# Altium PCB 24V-70A-Power-Board-v2.0.PcbDoc (part 3 of 9)
Units mm, origin at the board's own origin, x right, y up, seen from the top; angles counter-clockwise.
Board outline 350 x 215 mm, 2 copper layers (Top Layer, Bottom Layer), stack 1.64 mm thick; 337 components, 182 nets, 856 pads, 561 vias.
Unrouted connection lines stored in the file: 58.
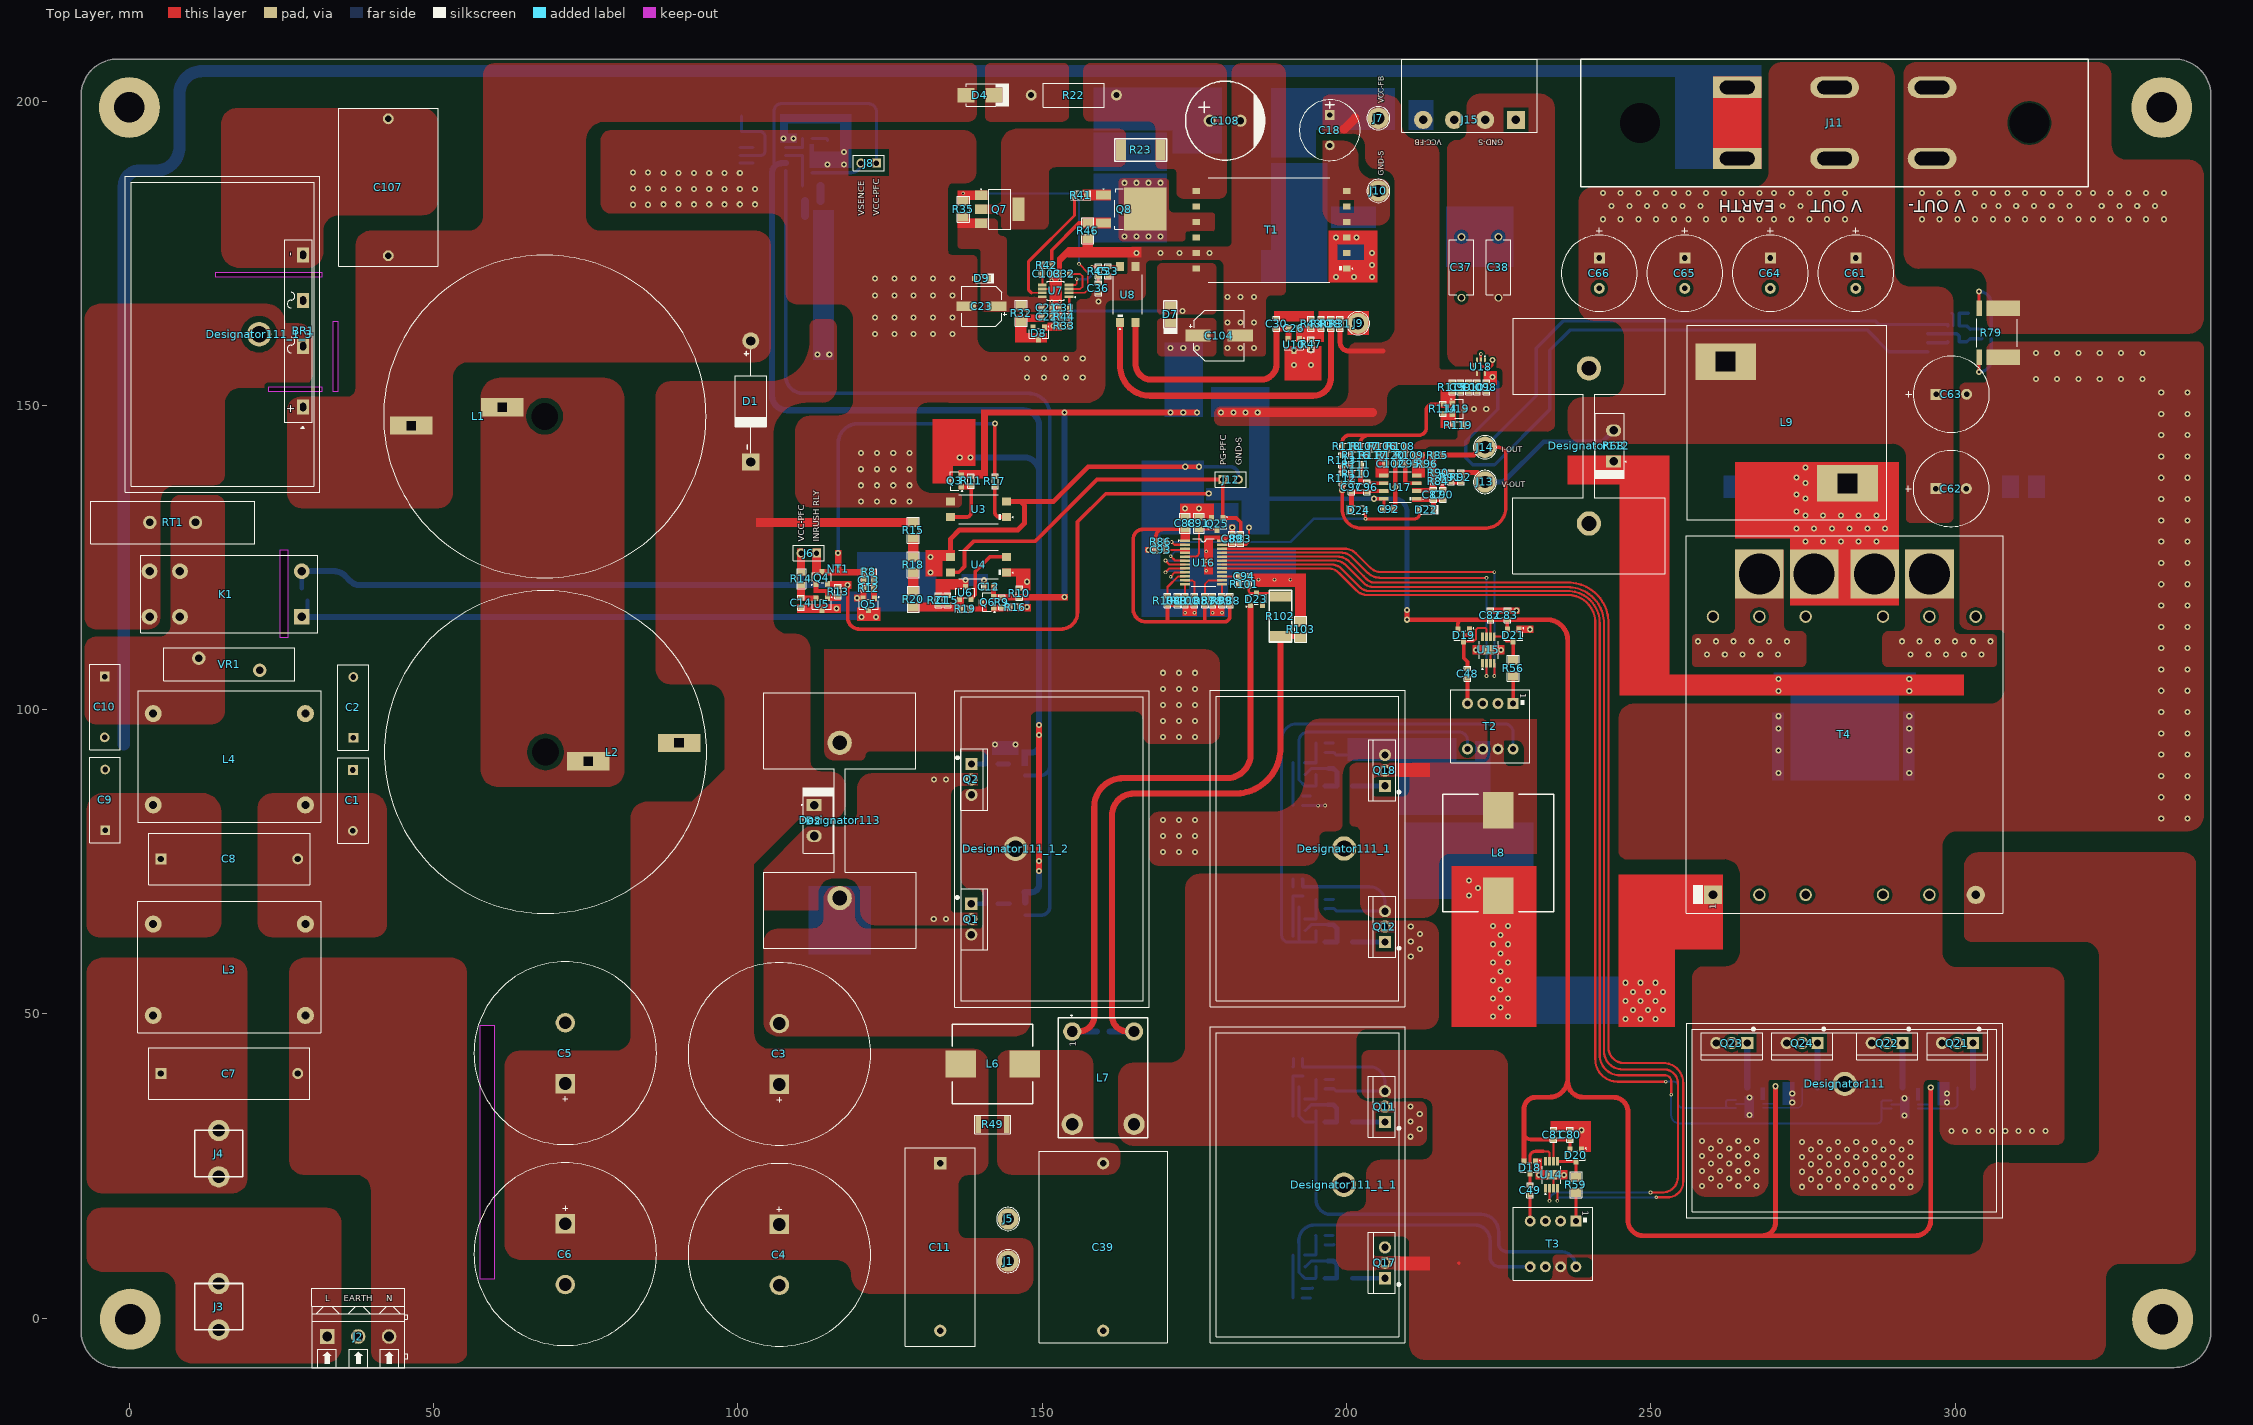
[diagram p0: Top Layer view]

## Part data (continued)
J1 J7 J13 J14: "PC TEST POINT MULTIPURPOSE RED", LCSC Part Number=C2906765, Manufacturer="Keystone Electronics", ComponentLink1Description=https://datasheet.ciiva.com/11744/0900766b8009b7c7-11744920.pdf?src-supplier=Rs, ComponentLink1URL=https://datasheet.ciiva.com/11744/0900766b8009b7c7-11744920.pdf?src-supplier=Rs, ComponentLink2Description=https://datasheet.ciiva.com/16506/m60-2p60-16506972.pdf?src-supplier=Future+Electronics, ComponentLink2URL=https://datasheet.ciiva.com/16506/m60-2p60-16506972.pdf?src-supplier=Future+Electronics, ComponentLink3Description=https://datasheet.ciiva.com/22631/1703983-22631113.pdf?src-supplier=Element14, ComponentLink3URL=https://datasheet.ciiva.com/22631/1703983-22631113.pdf?src-supplier=Element14, ComponentLink4Description=https://datasheet.ciiva.com/16883/70182825-16883886.pdf?src-supplier=Allied+Electronics, ComponentLink4URL=https://datasheet.ciiva.com/16883/70182825-16883886.pdf?src-supplier=Allied+Electronics, ComponentLink5Description=https://datasheet.ciiva.com/2917/5010-2917626.pdf?src-supplier=Digikey, ComponentLink5URL=https://datasheet.ciiva.com/2917/5010-2917626.pdf?src-supplier=Digikey, ComponentLink6Description=https://datasheet.ciiva.com/1454/1703983-1454833.pdf?src-supplier=Element14, ComponentLink6URL=https://datasheet.ciiva.com/1454/1703983-1454833.pdf?src-supplier=Element14, Item Type=Connectors, Manufacturer Part Number=5010, Pricing="1=0.38, 25=0.308, 100=0.3015, 250=0.28304, 500=0.2523, 1000=0.17746, 2500=0.16225, 5000=0.15211 (USD)", RoHS=Yes, Stock=128327, Supplier=Digikey
J2: "1x3P 18A -40℃~+105℃ 250V Orange 12~30 Direct Insert 5.08mm 2.5 1 3 Plugin,P=5.08mm Screw Terminal Blocks ROHS", LCSC Part Number=C430604, Manufacturer=DORABO, Package=Plugin,P=5.08mm, ComponentLink1Description=LCSC, ComponentLink1URL=https://www.lcsc.com/product-detail/Screw-Terminal-Blocks_DORABO-DB128L-5-08-3P-OG-S_C430604.html, Item Type="Terminal Block", Manufacturer Part Number=DB128L-5.08-3P-OG-S
J3 J4: "FUSE CLIP CARTRIDGE 250V 15A PCB", LCSC Part Number=C142745, Manufacturer=Littelfuse, ComponentLink1Description=https://datasheet.ciiva.com/30471/0900766b8128f6e8-30471828.pdf?src-supplier=Rs, ComponentLink1URL=https://datasheet.ciiva.com/30471/0900766b8128f6e8-30471828.pdf?src-supplier=Rs, ComponentLink2Description=https://datasheet.ciiva.com/14119/102-series-eng-tds-14119839.pdf?src-supplier=Distrelec, ComponentLink2URL=https://datasheet.ciiva.com/14119/102-series-eng-tds-14119839.pdf?src-supplier=Distrelec, ComponentLink3Description=https://datasheet.ciiva.com/1269/1480080-1269262.pdf?src-supplier=Element14, ComponentLink3URL=https://datasheet.ciiva.com/1269/1480080-1269262.pdf?src-supplier=Element14, ComponentLink4Description=https://datasheet.ciiva.com/1270/littelfuse-fuse-clips-1270929.pdf?src-supplier=Element14, ComponentLink4URL=https://datasheet.ciiva.com/1270/littelfuse-fuse-clips-1270929.pdf?src-supplier=Element14, ComponentLink5Description=https://datasheet.ciiva.com/295/littelfuse-fuse-clips-295516.pdf?src-supplier=Digikey, ComponentLink5URL=https://datasheet.ciiva.com/295/littelfuse-fuse-clips-295516.pdf?src-supplier=Digikey, ComponentLink6Description=https://datasheet.ciiva.com/15201/getdatasheetpartid-336939-15201068.pdf?src-supplier=Verical, ComponentLink6URL=https://datasheet.ciiva.com/15201/getdatasheetpartid-336939-15201068.pdf?src-supplier=Verical, Item Type="Fuse Holder", Lead Free=5697LeadFree, Manufacturer Part Number=01020071Z, Pricing="1=0.27, 5=0.228, 10=0.21, 50=0.1754, 100=0.1622, 250=0.14612, 500=0.13502, 1000=0.12473, 5000=0.1036 (USD)", RoHS=Yes, Stock=48674, Supplier=Digikey
J5 J10: "PC TEST POINT MULTIPURPOSE BLACK", LCSC Part Number=C238127, Manufacturer="Keystone Electronics", ComponentLink1Description=https://datasheet.ciiva.com/11744/0900766b8009b7c7-11744935.pdf?src-supplier=Rs, ComponentLink1URL=https://datasheet.ciiva.com/11744/0900766b8009b7c7-11744935.pdf?src-supplier=Rs, ComponentLink2Description=https://datasheet.ciiva.com/1454/1718230-1454834.pdf?src-supplier=Element14, ComponentLink2URL=https://datasheet.ciiva.com/1454/1718230-1454834.pdf?src-supplier=Element14, ComponentLink3Description=https://datasheet.ciiva.com/46412/1703983-46412138.pdf?src-supplier=Element14, ComponentLink3URL=https://datasheet.ciiva.com/46412/1703983-46412138.pdf?src-supplier=Element14, ComponentLink4Description=https://datasheet.ciiva.com/16351/m60-2p60-16351093.pdf?src-supplier=Future+Electronics, ComponentLink4URL=https://datasheet.ciiva.com/16351/m60-2p60-16351093.pdf?src-supplier=Future+Electronics, ComponentLink5Description=https://datasheet.ciiva.com/2917/5011-2917635.pdf?src-supplier=Digikey, ComponentLink5URL=https://datasheet.ciiva.com/2917/5011-2917635.pdf?src-supplier=Digikey, Gender=30Gender, Inside Diameter=1.78mm, Item Type=Connectors, Lead Free=5697LeadFree, Length=11.3mm, Manufacturer Part Number=5011, Pricing="1=0.38, 25=0.308, 100=0.3015, 250=0.28304, 500=0.2523, 1000=0.17746, 2500=0.16225, 5000=0.15211 (USD)", RoHS=Yes, Stock=243196, Supplier=Digikey
J6 J8 J12: "Gold 250V 3A Straight Square Pins 2.5mm 2P 260℃ 6mm -40℃~+105℃ 3mm 2.54mm Plugin Black Brass 1x2P Plugin,P=2.54mm Pin Headers ROHS", LCSC Part Number=C706874, Manufacturer=XKB, Package=Plugin,P=2.54mm, ComponentLink1Description=LCSC, ComponentLink1URL=https://www.lcsc.com/product-detail/Pin-Headers_XKB-Connectivity-X6511WV-02H-C60D30_C706874.html, Item Type="Male Header", Manufacturer Part Number=X6511WV-02H-C60D30
J9: "PC TEST POINT MULTIPURPOSE WHITE", LCSC Part Number=C2906766, Manufacturer="Keystone Electronics", ComponentLink1Description=https://datasheet.ciiva.com/27052/1582065-27052612.pdf?src-supplier=Jameco, ComponentLink1URL=https://datasheet.ciiva.com/27052/1582065-27052612.pdf?src-supplier=Jameco, ComponentLink2Description=https://datasheet.ciiva.com/16200/m60-2p60-16200039.pdf?src-supplier=Future+Electronics, ComponentLink2URL=https://datasheet.ciiva.com/16200/m60-2p60-16200039.pdf?src-supplier=Future+Electronics, ComponentLink3Description=https://datasheet.ciiva.com/22631/1703983-22631115.pdf?src-supplier=Element14, ComponentLink3URL=https://datasheet.ciiva.com/22631/1703983-22631115.pdf?src-supplier=Element14, ComponentLink4Description=https://datasheet.ciiva.com/16884/70182825-16884150.pdf?src-supplier=Allied+Electronics, ComponentLink4URL=https://datasheet.ciiva.com/16884/70182825-16884150.pdf?src-supplier=Allied+Electronics, ComponentLink5Description=https://datasheet.ciiva.com/2917/5012-2917634.pdf?src-supplier=Digikey, ComponentLink5URL=https://datasheet.ciiva.com/2917/5012-2917634.pdf?src-supplier=Digikey, ComponentLink6Description=https://datasheet.ciiva.com/1454/1703983-1454835.pdf?src-supplier=Element14, ComponentLink6URL=https://datasheet.ciiva.com/1454/1703983-1454835.pdf?src-supplier=Element14, Item Type=Connectors, Manufacturer Part Number=5012, Pricing="1=0.38, 25=0.308, 100=0.3015, 250=0.28304, 500=0.2523, 1000=0.17746, 2500=0.16225, 5000=0.15211 (USD)", RoHS=Yes, Stock=102631, Supplier=Digikey
J11: "1x3P With Cover Plate 3 1 16mm -40℃~+105℃ 76A 1kV Black 6~14 Straight Needle 16 Plugin,P=16mm Barrier Terminal Blocks ROHS", LCSC Part Number=C707770, Manufacturer="Cixi Kefa Elec", Package=Plugin,P=16mm, ComponentLink1Description=LCSC, ComponentLink1URL=https://www.lcsc.com/product-detail/Barrier-Terminal-Blocks_Cixi-Kefa-Elec-KF88SM-16-0-3P_C707770.html, Item Type="Terminal Block", Manufacturer Part Number=KF88SM-16.0-3P
J15: "TERM BLOCK HDR 4POS 90DEG 5.08MM", Housing Color=49Colour, LCSC Part Number=C90076, Manufacturer="Phoenix Contact", Max Operating Temperature=70°C, Voltage Rating (DC)=250V, ComponentLink1Description=https://datasheet.ciiva.com/15197/getdatasheetpartid-176352-15197330.pdf?src-supplier=Verical, ComponentLink1URL=https://datasheet.ciiva.com/15197/getdatasheetpartid-176352-15197330.pdf?src-supplier=Verical, ComponentLink2Description=https://datasheet.ciiva.com/795/1757268-795434.pdf?src-supplier=Digikey, ComponentLink2URL=https://datasheet.ciiva.com/795/1757268-795434.pdf?src-supplier=Digikey, ComponentLink3Description=https://datasheet.ciiva.com/7630/1697153-7630841.pdf?src-supplier=Element14, ComponentLink3URL=https://datasheet.ciiva.com/7630/1697153-7630841.pdf?src-supplier=Element14, ComponentLink4Description=https://datasheet.ciiva.com/16096/1757268-16096406.pdf?src-supplier=Onlinecomponents.com, ComponentLink4URL=https://datasheet.ciiva.com/16096/1757268-16096406.pdf?src-supplier=Onlinecomponents.com, ComponentLink5Description=https://datasheet.ciiva.com/29210/569323-da-01-en-grundgehaeuse-1757268-250-st-29210575.pdf?src-supplier=Conrad, ComponentLink5URL=https://datasheet.ciiva.com/29210/569323-da-01-en-grundgehaeuse-1757268-250-st-29210575.pdf?src-supplier=Conrad, ComponentLink6Description=https://datasheet.ciiva.com/16703/70054631-16703596.pdf?src-supplier=Allied+Electronics, ComponentLink6URL=https://datasheet.ciiva.com/16703/70054631-16703596.pdf?src-supplier=Allied+Electronics, Gender=29Gender, Item Type="Terminal Blocks", Lead Free=5697LeadFree, Manufacturer Part Number=1757268, Pricing="1=1.49, 10=1.003, 25=0.9588 (USD)", RoHS=Yes, Stock=18354, Supplier=Digikey
K1: "RELAY GEN PURPOSE SPST 16A 12V", LCSC Part Number=C6120224, Manufacturer=Panasonic, ComponentLink1Description=https://datasheet.ciiva.com/24416/mech-eng-lz-24416941.pdf?src-supplier=Onlinecomponents.com, ComponentLink1URL=https://datasheet.ciiva.com/24416/mech-eng-lz-24416941.pdf?src-supplier=Onlinecomponents.com, Item Type="Power Relays", Manufacturer Part Number=ALZ51B12W, Pricing="1=3.35, 10=2.79, 50=2.65, 100=2.4, 1000=1.72, 10000=1.72 (USD)", RoHS=Yes, Stock=24, Supplier=Mouser
L1 L2: library part 760801401, "FIXED IND 118UH 13.9A 0.022OHM", Manufacturer="Wurth Electronics", Supplier Part Number=732-760801401-ND, Item Type=Inductors, Manufacturer Part Number=760801401, Pricing="1=18.9, 5=17.01, 10=15.12, 20=14.175, 100=13.2301 (USD)", RoHS=No, Stock=36, Supplier=Digikey
L3 L4: "CMC 1MH 12A 2LN TH", Manufacturer="Wurth Electronics", Supplier Part Number=732-1454-ND, ComponentLink1Description=https://datasheet.ciiva.com/6216/7448251201-6216302.pdf?src-supplier=Digikey, ComponentLink1URL=https://datasheet.ciiva.com/6216/7448251201-6216302.pdf?src-supplier=Digikey, ComponentLink2Description=https://datasheet.ciiva.com/4952/7448251201-46375-4952324.pdf?src-supplier=Mouser, ComponentLink2URL=https://datasheet.ciiva.com/4952/7448251201-46375-4952324.pdf?src-supplier=Mouser, ComponentLink3Description=https://datasheet.ciiva.com/11796/0900766b804acf5b-11796661.pdf?src-supplier=Rs, ComponentLink3URL=https://datasheet.ciiva.com/11796/0900766b804acf5b-11796661.pdf?src-supplier=Rs, ComponentLink4Description=https://datasheet.ciiva.com/7754/1736539-7754744.pdf?src-supplier=Element14, ComponentLink4URL=https://datasheet.ciiva.com/7754/1736539-7754744.pdf?src-supplier=Element14, ComponentLink5Description=https://datasheet.ciiva.com/7211/70416-7211268.pdf?src-supplier=Newark, ComponentLink5URL=https://datasheet.ciiva.com/7211/70416-7211268.pdf?src-supplier=Newark, ComponentLink6Description=https://datasheet.ciiva.com/14124/ue7448251201-de-14124967.pdf?src-supplier=Distrelec, ComponentLink6URL=https://datasheet.ciiva.com/14124/ue7448251201-de-14124967.pdf?src-supplier=Distrelec, Item Type=Inductors, Manufacturer Part Number=7448251201, Pricing="1=6.33, 10=6.23, 50=4.94, 175=4.73006, 350=4.6368 (USD)", RoHS=Yes, Stock=1202, Supplier=Digikey
L5: library part 7447745022, "FIXED IND 2.2UH 3.6A 36 MOHM SMD", Manufacturer="Wurth Electronics", ComponentLink1Description=https://datasheet.ciiva.com/4954/7447745022-70534-4954819.pdf?src-supplier=Mouser, ComponentLink1URL=https://datasheet.ciiva.com/4954/7447745022-70534-4954819.pdf?src-supplier=Mouser, ComponentLink2Description=https://datasheet.ciiva.com/30489/0900766b811bf6b7-30489497.pdf?src-supplier=Rs, ComponentLink2URL=https://datasheet.ciiva.com/30489/0900766b811bf6b7-30489497.pdf?src-supplier=Rs, ComponentLink3Description=https://datasheet.ciiva.com/7892/1736408-7892891.pdf?src-supplier=Element14, ComponentLink3URL=https://datasheet.ciiva.com/7892/1736408-7892891.pdf?src-supplier=Element14, ComponentLink4Description=https://datasheet.ciiva.com/6700/7447745022-6700388.pdf?src-supplier=Digikey, ComponentLink4URL=https://datasheet.ciiva.com/6700/7447745022-6700388.pdf?src-supplier=Digikey, ComponentLink5Description=https://datasheet.ciiva.com/6700/7447745022-6700390.pdf?src-supplier=Digikey, ComponentLink5URL=https://datasheet.ciiva.com/6700/7447745022-6700390.pdf?src-supplier=Digikey, Item Type=Inductors, Manufacturer Part Number=7447745022, Pricing="1=1.87, 10=1.791, 50=1.612, 100=1.492, 500=1.433, 1000=1.313 (USD)", RoHS=Yes, Stock=1399, Supplier=Digikey
L6: "FIXED IND 2.3UH 17.5A 3.7MOHM SM", Manufacturer="Wurth Electronics", Supplier Part Number=732-7443550230CT-ND, ComponentLink1Description=https://datasheet.ciiva.com/4954/7443550230-82185-4954542.pdf?src-supplier=Mouser, ComponentLink1URL=https://datasheet.ciiva.com/4954/7443550230-82185-4954542.pdf?src-supplier=Mouser, ComponentLink2Description=https://datasheet.ciiva.com/11801/0900766b80f886e1-11801808.pdf?src-supplier=Rs, ComponentLink2URL=https://datasheet.ciiva.com/11801/0900766b80f886e1-11801808.pdf?src-supplier=Rs, ComponentLink3Description=https://datasheet.ciiva.com/7765/1735881-7765096.pdf?src-supplier=Element14, ComponentLink3URL=https://datasheet.ciiva.com/7765/1735881-7765096.pdf?src-supplier=Element14, ComponentLink4Description=https://datasheet.ciiva.com/6705/7443550230-6705035.pdf?src-supplier=Digikey, ComponentLink4URL=https://datasheet.ciiva.com/6705/7443550230-6705035.pdf?src-supplier=Digikey, ComponentLink5Description=https://datasheet.ciiva.com/6705/7443550230-6705036.pdf?src-supplier=Digikey, ComponentLink5URL=https://datasheet.ciiva.com/6705/7443550230-6705036.pdf?src-supplier=Digikey, Item Type=Inductors, Manufacturer Part Number=7443550230, Pricing="1=3.48, 10=3.41, 50=3.15, 100=3.02, 200=2.82 (USD)", RoHS=Yes, Stock=2613, Supplier=Digikey
L7: "Transformer, Current Sense, 1: 100, 24A", DC Resistance (DCR)=7mR, Manufacturer=Coilcraft, Package Quantity=29, Primary Current=24A, Supplier Part Number=994-CS4100V-01L, ComponentLink1Description=http://www.mouser.com/ds/2/597/senhitr-463493.pdf?src-supplier=Mouser, ComponentLink1URL=http://www.mouser.com/ds/2/597/senhitr-463493.pdf?src-supplier=Mouser, ComponentLink2Description=http://www.farnell.com/datasheets/1870394.pdf?src-supplier=Farnell, ComponentLink2URL=http://www.farnell.com/datasheets/1870394.pdf?src-supplier=Farnell, ComponentLink3Description=http://www.farnell.com/datasheets/1870394.pdf?src-supplier=Element14, ComponentLink3URL=http://www.farnell.com/datasheets/1870394.pdf?src-supplier=Element14, Item Type=Inductors, Lead Free="Contains Lead", Manufacturer Part Number=CS4100V-01L, Packaging=Rail/Tube, Pricing="1=11.28, 10=11.28, 50=11.28, 100=11.28, 1000=5.53, 10000=5.14 (USD)", Reach SVHC Compliant=No, RoHS=Yes, RoHS Compliant=Yes, Series=CS4xxx, Stock=520, Supplier=Mouser, Turns Ratio=1:100
L8: library part CSBL1809-100M, "SMD HIGH CURRENT POWER INDUCTOR", Manufacturer=Codaca, Supplier Part Number=4044-CSBL1809-100MCT-ND, Category="Fixed Inductors", Manufacturer Part Number=CSBL1809-100M, Pricing="1=4.25, 10=3.304, 25=2.986, 50=2.7654 (USD)", RoHS=No, Stock=69, Supplier=DigiKey
L9: library part CPRX3231L-8R2MC, "THT HIGH CURRENT POWER INDUCTOR", Manufacturer=Codaca, Item Type=INDUCTOR, Manufacturer Part Number=CPRX3231L-8R2MC, Pricing="1=20.99, 10=16.268, 25=14.688, 40=13.93475, 80=12.88975, 230=12.5 (USD)", RoHS=No, Stock=21